# Altium PCB TYPEC_4KRECEIVER-v1.0.PcbDoc (part 7 of 12)
Units mil, origin at the board's own origin, x right, y up, seen from the top; angles counter-clockwise.
Board outline 2834.7 x 1259.84 mil, 10 copper layers (Top Layer, GND-1, Signal L1, GND-2, PWR-1, PWR-2, GND-3, Signal L2, GND-4, Bottom Layer), stack 61.686 mil thick; 492 components, 339 nets, 2214 pads, 1169 vias.
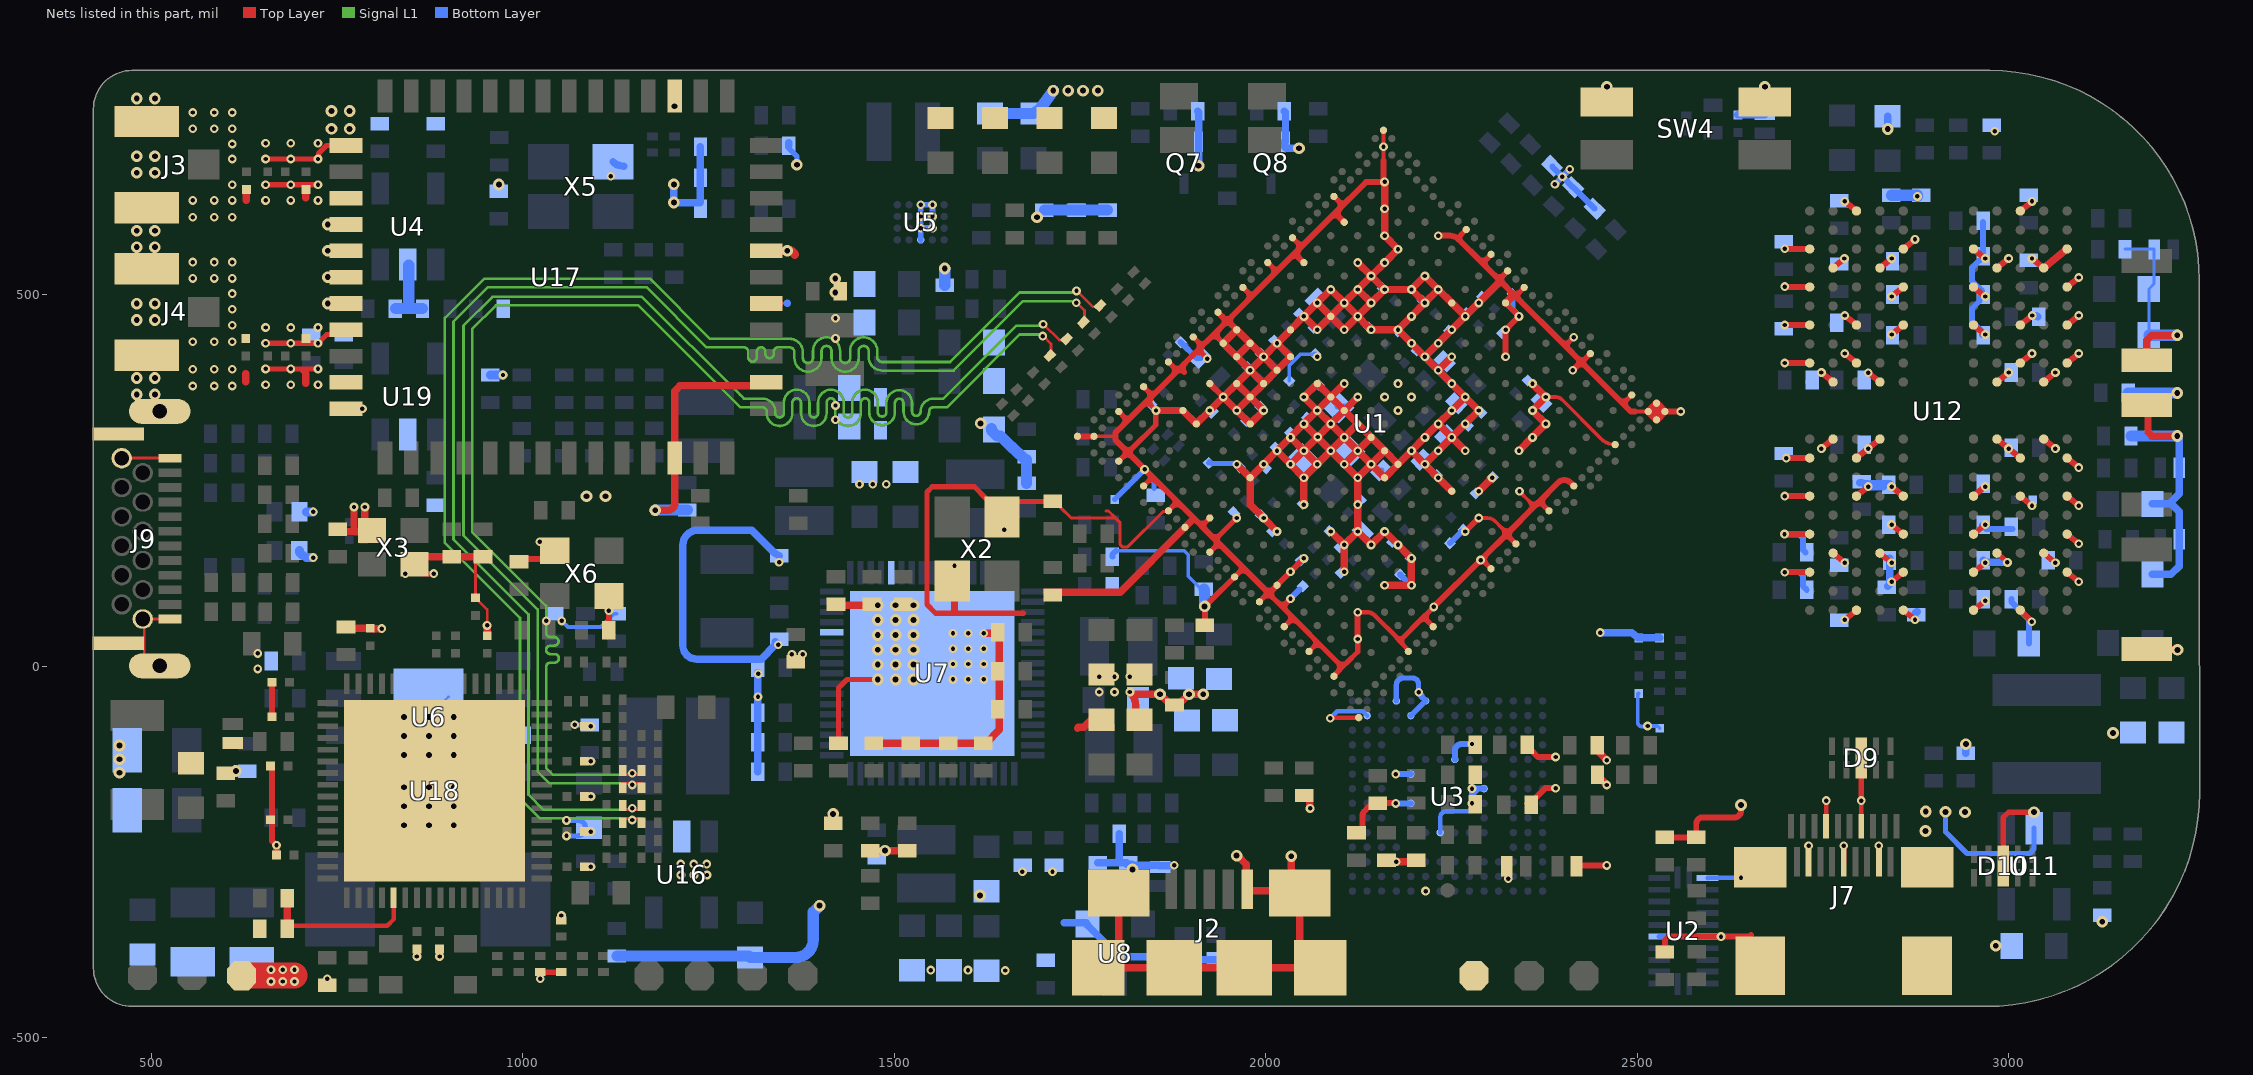
[diagram p12: the nets of this part, all layers, seen from the top]

## Via types
v1: diameter 11.81, hole 5.91, Top Layer to Bottom Layer, tented both sides, 698 vias
v2: diameter 15.75, hole 7.87, Top Layer to Bottom Layer, tented both sides, 248 vias
v3: diameter 11.81, hole 5.91, Top Layer to Signal L1, tented both sides, 121 vias
v4: diameter 11.81, hole 5.91, Top Layer to Bottom Layer, 44 vias
v5: diameter 11.81, hole 5.91, Signal L2 to Bottom Layer, 41 vias
v6: diameter 11.81, hole 5.91, Top Layer to Signal L1, 17 vias

## Nets (pads, with @x,y where several pads share a name; then routed paths per layer and width w, separated by ;. In a path a pad name is that pad's centre, name@x,y a point inside that pad or via, vN(x,y) a via of type N, cw(c..) or ccw(c..) an arc to the next point about the centre after c; other vN are vias at no path point) (continued)
GND: C1.1 C2.1 C3.1 C4.1 C5.1 C8.1 C9.1 C11.2 C12.1 C13.1 C14.1 C15.1 C16.1 C17.1 C18.1 C19.1 C20.1 C21.1 C22.1 C23.1 C24.1 C25.1 C26.1 C27.1 C28.1 C29.1 C30.1 C31.2 C32.1 C33.1 C34.1 C35.1 C36.1 C37.1 C38.2 C40.2 C41.1 C42.2 C43.2 C46.1 C47.1 C48.1 C52.1 C53.1 C54.1 C55.1 C61.2 C62.2 C63.1 C64.1 C65.2 C66.2 C67.1 C68.1 C69.1 C70.1 C71.1 C73.1 C77.2 C78.1 C79.1 C80.1 C81.1 C82.1 C83.1 C84.1 C85.1 C86.1 C87.1 C88.1 C89.1 C90.1 C91.1 C92.1 C93.1 C94.1 C95.1 C96.1 C97.1 C98.1 C99.1 C100.1 C101.1 C102.1 C103.1 C104.1 C105.1 C106.1 C107.1 C108.1 C109.1 C110.1 C111.1 C112.1 C113.1 C114.1 C115.1 C116.1 C117.1 C118.1 C119.2 C120.2 C121.2 C122.2 C123.1 C124.1 C125.1 C126.1 C127.1 C128.1 C129.1 C130.1 C131.1 C132.2 C133.1 C134.1 C135.1 C136.1 C137.1 C138.1 C139.1 C140.1 C141.1 C142.1 C143.1 C144.1 C145.1 C146.1 C147.1 C148.1 C149.2 C150.1 C151.1 C152.1 C153.1 C154.1 C155.1 C156.2 C157.2 C158.2 C159.2 C160.1 C161.1 C162.1 C163.1 C164.1 C165.2 C166.1 C167.1 C168.1 C169.2 C170.1 C171.1 C172.1 C173.1 C174.1 C175.2 C176.1 C178.1 C179.1 C180.1 C181.1 C182.1 C183.1 C184.1 C185.1 C186.1 C188.1 C189.2 C190.1 C191.1 C192.1 C193.1 C194.1 C195.1 C196.1 C197.1 C198.1 C199.1 C200.1 C201.1 C202.1 C203.1 C204.2 C205.2 C206.1 C207.1 C208.1 C209.1 C210.1 C211.1 C212.1 C213.1 C214.1 C215.1 C216.1 C217.1 C218.1 C220.1 C221.1 C223.1 C225.1 C227.1 C228.1 C229.1 C230.1 C231.1 C232.1 C233.1 C234.1 C235.1 C236.1 C237.1 C238.1 C239.1 C240.1 C241.1 C242.1 C243.1 C244.1 C245.1 C246.1 C247.1 C248.1 C249.1 C250.1 C251.2 C252.1 C253.1 C255.1 C256.1 C257.2 C258.1 C262.1 C273.1 C275.1 C287.1 C290.1 C293.1 C300.1 C310.1 C312.1 C313.1 C314.1 C315.1 C316.1 C317.1 C318.1 C319.1 C322.1 C323.1 C324.1 C325.1 C326.1 D1.1 D2.1 D3.1 D4.2 D5.2 D6.2 D7.2 D8.2 D9.3_8 D10.3_8 D11.1 D29.2 D30.2 D31.2 J2.5 J2.S1 J2.S2 J2.S3 J2.S4 J2.S5 J2.S6 J3.2 J3.3 J4.2 J4.3 J7.4 J7.7 J7.10 J7.13 J7.16 J7.20 J9.1 J9.2 J9.3 J9.4 J9.A1 J9.A12 J9.B1 J9.B12 Q7.2 Q8.2 R1.1 R8.1 R11.1 R16.1 R23.1 R24.1 R27.1 R30.1 R33.2 R42.1 R73.2 R86.1 R89.1 R101.1 R108.1 R110.1 R111.2 R113.2 R120.2 R122.2 R123.1 R129.2 R153.2 SW1.1 SW2.1 SW3.2 SW4.2 SW4.4 TP2.1 TP6.1 U1.1B10 U1.1B11 U1.1B15 U1.1B19 U1.1C4 U1.1C5 U1.1C6 U1.1C8 U1.1C9 U1.1C14 U1.1C16 U1.1C18 U1.1D1 U1.1D3 U1.1D4 U1.1D10 U1.1D14 U1.1E3 U1.1E8 U1.1E10 U1.1E14 U1.1E15 U1.1E17 U1.1F6 U1.1F7 U1.1F8 U1.1F9 U1.1F10 U1.1F15 U1.1F16 U1.1F20 U1.1G3 U1.1G6 U1.1G7 U1.1G8 U1.1G9 U1.1G10 U1.1G11 U1.1G12 U1.1G14 U1.1G16 U1.1G18 U1.1G19 U1.1G20 U1.1H1 U1.1H2 U1.1H6 U1.1H11 U1.1H12 U1.1H13 U1.1J1 U1.1J5 U1.1J6 U1.1J8 U1.1J9 U1.1J11 U1.1J12 U1.1J13 U1.1J16 U1.1J18 U1.1K2 U1.1K3 U1.1K4 U1.1K5 U1.1K6 U1.1K8 U1.1K9 U1.1K11 U1.1K12 U1.1K13 U1.1K14 U1.1K15 U1.1K18 U1.1L3 U1.1L6 U1.1L10 U1.1L11 U1.1L12 U1.1L13 U1.1L14 U1.1L15 U1.1L19 U1.1M3 U1.1M4 U1.1M5 U1.1M6 U1.1M10 U1.1M11 U1.1M12 U1.1M13 U1.1M14 U1.1M15 U1.1M16 U1.1M17 U1.1M20 U1.1N3 U1.1N4 U1.1N7 U1.1N11 U1.1N12 U1.1N17 U1.1P1 U1.1P5 U1.1P6 U1.1P7 U1.1P8 U1.1P10 U1.1P14 U1.1P15 U1.1R3 U1.1R4 U1.1R5 U1.1R6 U1.1R7 U1.1R8 U1.1R9 U1.1R11 U1.1R12 U1.1R13 U1.1R14 U1.1R15 U1.1T3 U1.1T5 U1.1T7 U1.1T8 U1.1T9 U1.1T10 U1.1T11 U1.1T12 U1.1T13 U1.1T14 U1.1T15 U1.1T16 U1.1T17 U1.1U2 U1.1U12 U1.1U13 U1.1U15 U1.1U17 U1.1V1 U1.1V4 U1.1V7 U1.1V12 U1.1V13 U1.1V18 U1.A1 U1.A2 U1.A38 U1.AA2 U1.AC37 U1.AD2 U1.AE37 U1.AH37 U1.AL37 U1.AP2 U1.AP8 U1.AP13 U1.AP16 U1.AP19 U1.AP22 U1.AP25 U1.AP28 U1.AP31 U1.AP34 U1.AP37 U1.AR1 U1.AR38 U1.B1 U1.B2 U1.B6 U1.B11 U1.B14 U1.B18 U1.B21 U1.B28 U1.B31 U1.D2 U1.E37 U1.H37 U1.J2 U1.L2 U1.L37 U1.P37 U1.U2 U1.U37 U1.W2 U1.Y37 U2.5 U2.13 U2.18 U3.A6 U3.C4 U3.E7 U3.G5 U3.H10 U3.J5 U3.K8 U3.N2 U3.N5 U3.P4 U3.P6 U4.2 U5.B2 U5.B3 U5.B4 U5.C1 U5.C2 U5.C3 U5.C4 U6.7 U6.9 U7.47 U7.56 U7.62 U7.63 U7.69 U8.1 U11.2 U12.A3 U12.A10 U12.AB3 U12.AB5 U12.AB8 U12.AB10 U12.C1 U12.C5 U12.C8 U12.C12 U12.D2 U12.D4 U12.D9 U12.D11 U12.E1 U12.E5 U12.E8 U12.E12 U12.G1 U12.G3 U12.G5 U12.G8 U12.G10 U12.G12 U12.J1 U12.J3 U12.J10 U12.J12 U12.K2 U12.K4 U12.K9 U12.K11 U12.N2 U12.N4 U12.N9 U12.N11 U12.P1 U12.P3 U12.P10 U12.P12 U12.T1 U12.T3 U12.T5 U12.T8 U12.T10 U12.T12 U12.V1 U12.V5 U12.V8 U12.V12 U12.W2 U12.W4 U12.W9 U12.W11 U12.Y1 U12.Y5 U12.Y8 U12.Y12 U16.2 U17.1 U17.3 U17.4 U17.5 U17.6 U17.7 U17.8 U17.10 U17.11 U17.23 U17.27 U17.30 U17.32 U17.39 U18.65 U19.2 X2.2 X2.4 X3.2 X3.4 X5.2 X6.2 X6.4 | length 20453.2
  Top Layer w3.5: X3.4@854.4,136.88 X3.4@866.94,124.34 ; C66.2@936.55,143.19 C318.1@936.55,91.78 952.3,76.03 v4@952.3,56.6
  Top Layer w4: J9.B1@462.4,279.73 J9.A12@527.36,279.73 ; J9.3@513.58,0.19 490.73,0.19 490.73,63.19 J9.A1@527.36,63.19
  Top Layer w4.1: C129.1@1713.28,221.53 1716.78,221.53 1723.73,214.58 1723.73,213.86 1738.11,199.48 1797.71,199.48 ; 1785.16,208.72 1788.47,208.72 1797.71,199.48 ; U1.AE37@1868.12,207.8 1861.82,207.8 1814.38,160.36 1807.18,160.36 1804.24,163.3 1804.24,192.96 1797.71,199.48
  Top Layer w5: J2.S6@1760.78,-392.14 J2.S6@1774.57,-405.92 ; U1.AP37@1769,309.12 1797.55,309.12 1797.7,309.27 ; 2158.75,680.53 v1(2158.75,698.86) U1.AR1@2158.75,721.14 ; v1(2286.83,199.16) 2298.51,199.16 cw(c2298.51,184.16) 2309.11,194.77 ; v1(2289.35,142.53) 2290.66,141.22 v1@2293.24,141.22 ; 2309.12,194.77 2317.7,186.18 ; 2319.99,173.16 ccw(c2309.55,178.04) 2317.72,186.16 ccw(c2325.67,194.16) 2331.1,184.27 ; v1@2341.75,234.7 2354.74,221.71 ; 2356.46,209.22 ccw(c2346.02,214.1) 2356.76,209.93 ccw(c2346.02,214.1) 2354.19,222.22 ccw(c2362.14,230.22) 2354.74,221.71 ; 2358.35,210.73 ccw(c2350.74,214) 2358.76,211.93 ccw(c2350.74,214) 2356.6,219.85 ; 2367.57,220.34 cw(c2362.14,230.22) 2366.76,219.94 cw(c2362.14,230.22) 2354.74,221.71 ; 2369.16,221.54 cw(c2361.78,228.93) 2368.99,221.37 cw(c2361.78,228.93) 2366.37,219.54 cw(c2361.78,228.93) 2356.6,219.85 ; v1(2377.28,362.02) 2390.97,362.02 cw(c2390.97,351.39) 2398.48,358.9 2451.52,305.87 ; 2451.54,305.85 ccw(c2470.54,324.89) U1.B6@2470.54,297.99 ; 2496.99,342.53 U1.B2@2515.08,342.53 ; 2354.74,221.71 2356.6,219.85
  Top Layer w6: v1(2087.02,-70.26) 2087.4,-69.87 2124.56,-69.87 U1.A38@2124.63,-69.95 ; v1(2123.94,72.49) 2136.3,72.49 cw(c2136.3,57.49) 2146.9,68.1 ; 2146.91,68.1 2177.81,37.19 ccw(c2176.83,75.22) 2184.87,38.04 ccw(c2222.05,30) 2184.01,30 ; 2176.83,37.18 2179.84,34.16 2184.01,30 ; U1.B31@2192.54,20.1 2184.01,30 ; J7.13@2754.73,-215.28 v1(2754.73,-181.19) v1@2754.73,-179.97 ; J7.7@2801.78,-215.48 v1(2801.78,-181.19)
  Top Layer w7: v3(654.01,399.84) v3(687.94,399.84) 701.8,399.84 ; v3(654.01,434.41) v3(687.94,434.41) v3(724.55,434.41) 736.36,446.22 755.88,446.22 U17.8@762.22,452.56 ; v3(654.01,647.87) v3(687.94,647.87) v3(724.55,647.87) ; v3(654.01,682.45) v3(687.94,682.45) v3(724.55,682.45) 725.47,683.37 725.47,689.87 736.2,700.59 U17.1@762.22,700.59 ; 708.21,393.43 708.21,393.58 705.88,395.91 705.73,395.91 701.8,399.84 ; v3(724.55,399.84) 701.8,399.84 ; R120.2@1023.83,-412.12 R122.2@1052.04,-412.12 ; C41.1@1425.18,-103.76 1425.18,-29.48 1436.5,-18.16 v2(1478.09,-18.16) ; X2.4@1627.8,222.22 1625.13,224.89 1624.47,224.89 1608.05,241.31 1551.41,241.31 1544.16,234.05 1544.16,82.64 1555.75,71.05 1561.21,71.05 1674.17,71.05 ; X2.4@1648.88,205.04 1665.37,221.53 C129.1@1713.28,221.53 ; C130.1@1703.71,100.59 C130.1@1703.71,100.86 ; U1.AL37@1802.41,275.71 1810.12,283.43 ; U1.AP34@1802.6,342.36 1810.31,334.64 ; 1808.06,324.09 ccw(c1801.49,330.65) 1808.95,325.13 ccw(c1801.49,330.65) 1809.32,335.63 ccw(c1814.48,340.81) 1818.63,334.8 ccw(c1814.48,340.81) 1819.29,335.32 ; 1808.38,293.7 ccw(c1814.94,300.28) 1809.85,292.51 ccw(c1814.94,300.28) 1819.92,292.44 ccw(c1825.1,287.29) 1819.26,291.66 ; 1809.45,292.41 cw(c1803.96,287.59) 1809.14,282.44 cw(c1814.12,274.6) 1820.15,281.66 ; 1819.62,282.47 cw(c1825.1,287.29) 1819.46,282.65 ; 1820.68,281.17 ccw(c1814.12,274.6) 1820.15,281.66 ; U1.AH37@1835.82,242.31 1843.53,250.02 ; 1835.82,350.96 cw(c1840.64,345.47) 1845.79,350.65 cw(c1853.63,355.63) 1847.06,362.19 ; U1.AP31@1835.82,375.93 1843.53,368.22 ; v1(1837.14,264.59) 1820.85,280.88 cw(c1827.39,287.42) 1820.15,281.66 ; 1841.27,357.66 ccw(c1834.7,364.22) 1842.54,369.2 ccw(c1847.69,374.38) 1852.51,368.9 ; 1842.85,259 cw(c1837.37,254.18) 1842.54,249.03 cw(c1847.53,241.19) 1854.09,247.77 ; 1844.8,351.63 v1(1852.52,343.92) ; U1.1V18@1852.05,343.46 1852.05,324.32 1818.95,291.21 ; U1.AE37@1869.22,208.9 1876.94,216.61 ; U1.AP28@1869.22,409.34 1876.94,401.63 ; 1874.68,391.07 ccw(c1868.11,397.63) 1875.95,402.61 ccw(c1881.1,407.79) 1885.91,402.3 ; 1876.26,225.59 cw(c1870.77,220.78) 1875.95,215.63 cw(c1880.93,207.79) 1887.49,214.36 ; 1880.09,396.47 cw(c1884.91,390.98) 1880.92,397.1 ; 1880.58,395.81 cw(c1885.39,390.32) 1890.54,395.5 ; 1890.29,406.46 cw(c1897.9,401.14) 1891.33,407.7 ; 1890.55,395.5 cw(c1898.38,400.49) 1891.81,407.05 ; U1.AP25@1902.63,442.75 1910.34,435.03 ; 1904.66,420.47 cw(c1909.48,414.98) 1914.63,420.15 cw(c1922.47,425.14) 1915.9,431.7 ; 1907.53,194.68 ccw(c1914.09,201.25) 1908.6,193.76 ccw(c1914.09,201.25) 1919.08,193.41 ccw(c1924.25,188.26) 1918.24,184.12 ccw(c1924.25,188.26) 1918.77,183.44 ; 1908.09,424.48 ccw(c1901.52,431.04) 1909.35,436.02 ccw(c1914.51,441.2) 1919.32,435.71 ; 1913.64,421.14 v1(1921.36,413.43) ; 1918.09,192.42 1924.86,199.19 U1.1M20@1925.8,200.13 ; U1.Y37@1924.9,153.22 1932.61,160.94 ; 1925.81,176.63 ccw(c1932.37,183.2) 1937.29,175.33 ; 1926.3,441.44 cw(c1931.12,435.95) 1936.27,441.12 cw(c1944.11,446.11) 1937.53,452.67 ; 1931.94,169.91 cw(c1926.45,165.1) 1931.63,159.95 cw(c1936.61,152.11) 1943.17,158.68 ; 1935.28,442.11 U1.1V13@1943,434.4 ; U1.AP22@1936.04,476.15 1943.75,468.44 ; 1936.37,174.37 1944.08,182.09 ; 1936.95,174.99 1937.29,175.33 ; 1937.04,165.4 cw(c1942.53,170.21) 1937.35,175.36 cw(c1932.37,183.2) 1937.29,175.33 ; 1941.49,457.88 ccw(c1934.92,464.44) 1942.76,469.42 ; 1942.76,469.43 ccw(c1947.91,474.6) 1952.73,469.12 ; 1944.4,459.53 cw(c1949.21,454.04) 1954.34,459.24 ; 1953.37,460.21 U1.1V12@1961.09,452.49 ; 1954.36,459.22 cw(c1962.2,464.2) 1955.63,470.76 ; U1.U37@1958.31,119.82 1966.02,127.53 ; v1(1961.09,199.16) 1937.29,175.33 ; 1965.35,136.51 cw(c1959.86,131.69) 1966.14,127.97 cw(c1959.86,131.69) 1965.03,126.54 cw(c1970.02,118.7) 1976.58,125.27 ; U1.AP19@1969.44,509.56 1977.16,501.85 ; 1974.9,491.29 ccw(c1968.33,497.85) 1976.17,502.83 ccw(c1981.32,508.01) 1986.13,502.52 ; U1.P37@1991.71,86.41 1999.43,94.12 ; 1998.66,103.59 ccw(c2005.22,110.16) 2010.2,102.32 ccw(c2015.38,97.17) 2009.89,92.36 ; 1998.75,103.1 cw(c1993.26,98.29) 1998.44,93.14 cw(c2003.42,85.3) 2009.99,91.87 ; 1999.52,102.84 ccw(c2008.63,148.4) 2008.63,101.94 ; U1.AP16@2002.85,542.97 2010.56,535.25 ; 2008.06,93.94 2022.73,79.28 ; 2008.31,524.7 ccw(c2001.74,531.26) 2009.57,536.24 ccw(c2014.73,541.42) 2019.54,535.93 ; 2009.22,101.33 2015.97,108.09 U1.1G20@2016.93,109.05 ; 2016.4,85.68 ccw(c2022.96,92.25) 2026.58,83.7 ; U1.L37@2025.12,53 2032.83,60.72 ; 2026.96,83.43 2033.8,90.26 U1.1F20@2034.67,91.14 ; 2027.64,74.45 cw(c2033.13,79.26) 2027.95,84.41 cw(c2022.96,92.25) 2026.58,83.7 ; 2032.16,69.69 cw(c2026.67,64.88) 2031.85,59.73 cw(c2036.83,51.89) 2043.39,58.46 ; v1(2033.47,90.59) 2027.69,84.81 2026.58,83.7 ; 2034.87,550.01 cw(c2039.69,544.52) 2044.82,549.72 ; U1.AP13@2036.26,576.37 2043.97,568.66 ; 2041.71,558.1 ccw(c2035.14,564.66) 2042.98,569.64 ccw(c2048.13,574.82) 2052.95,569.34 ; 2043.85,550.68 U1.1V7@2051.57,542.97 ; 2044.84,549.7 cw(c2052.68,554.68) 2046.11,561.24 ; U1.H37@2058.53,19.6 2066.24,27.31 ; 2065.57,36.29 cw(c2060.08,31.47) 2065.25,26.32 cw(c2070.24,18.48) 2076.8,25.05 ; 2089.16,604.29 cw(c2093.98,598.8) 2099.03,604.07 cw(c2093.98,598.8) 2099.13,603.98 cw(c2106.97,608.96) 2100.4,615.52 ; U1.E37@2091.43,-13.41 2109.35,4.5 cw(c2103.39,11.31) 2097.84,4.17 2022.73,79.28 ; U1.AP8@2091.93,632.05 2099.65,624.34 ; 2096.74,-7.9 ccw(c2090.17,-1.34) 2098,3.64 ccw(c2103.16,8.82) 2107.97,3.33 ; 2097.39,613.78 ccw(c2090.82,620.34) 2098.66,625.32 ; 2098.14,604.97 U1.1V4@2105.85,597.25 ; 2098.66,625.32 ccw(c2103.81,630.5) 2108.63,625.01 ; 2109.45,4.6 2123.94,19.1 v1(2123.94,36.3) ; 2180.99,34.16 2184.87,38.04 2207.87,61.04 ; U1.B28@2225.56,53 2217.85,60.72 ; v1(2226.35,79.53) 2219.11,72.28 ; 2262.39,579.8 2263.37,580.78 ; 2263.06,570.82 cw(c2268.55,575.63) 2262.18,572.08 cw(c2268.55,575.63) 2263.37,580.78 ; U1.AD2@2270.1,587.51 2263.38,580.78 ; 2285.97,548.85 ccw(c2292.53,555.42) 2294.66,546.38 ; v1@2286.22,138.59 cw(c2291.03,133.1) 2296.18,138.28 ; 2286.97,547.28 ccw(c2291.8,555.22) 2294.66,546.38 ; v1@2291.04,143.42 2296.18,138.28 ; 2296.53,546.59 U1.AA2@2303.77,553.84 ; 2297.21,537.62 cw(c2302.7,542.43) 2297.52,547.58 ; 2297.45,149.82 ccw(c2304.02,143.26) 2296.18,138.28 ; U1.AA2@2303.51,554.1 2296.78,547.37 cw(c2291.8,555.22) 2294.66,546.38 ; U1.B21@2303.91,130.55 U1.B21@2303.51,130.95 2296.2,138.27 ; 2307.51,526.37 ccw(c2314.07,532.95) 2309.24,525.02 ccw(c2314.07,532.95) 2316.93,524.11 ; 2308.25,526.58 ccw(c2314.81,533.15) 2316.93,524.11 ; 2311.01,523.1 cw(c2305.52,518.28) 2310.7,513.13 cw(c2315.68,505.29) 2311.88,513.76 cw(c2315.68,505.29) 2322.24,511.86 ; 2318.07,524.12 2318.64,524.69 cw(c2314.81,533.15) 2316.93,524.11 ; 2318.7,524.72 ccw(c2324.23,519.96) 2317.85,516.4 ccw(c2324.23,519.96) 2318.74,515.14 ; 2318.8,524.32 2326.05,531.57 U1.W2@2326.52,532.04 ; 2319.48,515.35 cw(c2324.97,520.16) 2319.79,525.31 ; 2319.62,172 cw(c2324.44,166.51) 2329.59,171.69 ; U1.1J1@2322.78,488.9 2328.5,494.61 ; U1.1J1@2323,488.68 2329.46,495.15 ; 2324.45,176.82 2329.59,171.69 ; U1.W2@2325.78,531.83 2319.05,525.1 cw(c2314.07,532.95) 2316.93,524.11 ; 2328.28,505.7 cw(c2322.79,500.89) 2327.97,495.74 cw(c2332.95,487.9) 2339.51,494.47 ; 2328.51,494.62 cw(c2333.49,486.79) 2329.46,495.15 ; 2330.86,183.23 ccw(c2337.43,176.67) 2329.59,171.69 ; 2331.51,502.74 ccw(c2336.34,510.67) 2341.32,502.83 ; 2334.28,499.97 2329.46,495.15 ; U1.B18@2337.31,163.96 U1.B18@2336.92,164.36 2329.6,171.67 ; 2340.05,493.36 ccw(c2333.49,486.79) 2329.46,495.15 ; 2340.34,501.85 2341.32,502.83 ; 2341.01,492.87 cw(c2346.5,497.69) 2340.12,494.13 cw(c2346.5,497.69) 2341.32,502.83 ; U1.U2@2348.05,509.56 2341.32,502.83 ; 2364.17,216.54 cw(c2368.98,211.05) 2374.13,216.23 ; 2368.99,221.37 2374.13,216.23 ; 2375.4,227.77 ccw(c2381.97,221.21) 2374.13,216.23 ; U1.B14@2381.86,208.5 U1.B14@2381.46,208.9 2374.14,216.22 ; 2396.61,437.38 ccw(c2403.17,443.96) 2397.97,436.27 ccw(c2403.17,443.96) 2408.15,436.11 ; 2407.17,435.13 2408.15,436.11 ; 2407.85,426.15 cw(c2413.33,430.97) 2407.15,427.08 cw(c2413.33,430.97) 2408.15,436.11 ; U1.1D1@2412.69,397.43 v1(2413.47,398.21) 2420.4,405.14 ; U1.L2@2414.88,442.84 2414.63,442.58 2408.16,436.11 ; 2418.86,415.02 ccw(c2425.43,421.59) 2420.54,413.69 ccw(c2425.43,421.59) 2430.4,413.75 ; 2419.42,404.15 cw(c2424.4,396.32) 2430.96,402.89 ; 2419.41,404.16 ccw(c2414.24,409.3) 2419.72,414.12 ; 2429.42,412.76 2430.4,413.74 ; 2430.1,403.78 cw(c2435.59,408.6) 2429.24,405 cw(c2435.59,408.6) 2430.4,413.74 ; U1.J2@2437.14,420.48 2430.41,413.75 ; 2474.54,359.34 ccw(c2481.1,365.91) 2476.22,358.01 ccw(c2481.1,365.91) 2486.08,358.07 ; 2485.1,357.09 2486.08,358.07 ; 2485.78,348.11 cw(c2491.26,352.92) 2484.91,349.32 cw(c2491.26,352.92) 2486.08,358.07 ; U1.D2@2492.81,364.8 2486.09,358.07 ; J7.16@2730.91,-263.51 v1(2730.91,-241.83) ; J7.10@2778.15,-263.51 v3(2778.15,-241.83) ; v1(2801.78,-181.19) D9.3_8@2801.78,-123.75 ; J7.4@2825.4,-263.51 v3(2825.4,-241.83) ; U12.W9@2984.32,151.9 v1@2998.65,139.76 ; D10.3_8@2992.74,-268.96 2992.74,-203.83 2999.84,-196.73 v2(3034.35,-196.73) ; v1(2998.41,139.48) v1@2998.65,139.72 ; 1818.95,291.21 cw(c1825.1,287.29) 1819.26,291.66 ; 1818.95,291.21 cw(c1827.39,287.42) 1819.07,291.47 1819.26,291.66 ; 1818.95,291.21 ccw(c1827.39,287.42) 1819.15,283.21 ccw(c1827.39,287.42) 1819.46,282.65 ; 1818.95,291.21 ccw(c1825.1,287.29) 1818.86,283.5 ccw(c1825.1,287.29) 1819.46,282.65 ; 1819.46,282.65 ccw(c1827.39,287.42) 1820.15,281.66 ; 2022.73,79.28 2022.73,79.85 2026.58,83.7 ; 2207.87,61.04 cw(c2212.69,55.55) 2217.83,60.73 ; 2207.87,61.04 2212.7,65.87 ; 2212.7,65.87 2219.1,72.27 ; 2212.7,65.87 2217.83,60.73 ; 2217.84,60.73 cw(c2225.67,65.71) 2219.1,72.27
  Top Layer w7.5: X3.4@866.94,124.34 v3(880.25,124.34)
  Top Layer w8: C317.1@662.7,-134.72 662.7,-235.28 v4@668.1,-240.67 ; C146.1@662.7,-68.28 C55.1@662.7,-22.01 ; C323.1@995.17,140.47 998.52,143.83 1031.79,143.83 X6.2@1043.27,155.31 ; C322.1@1116.1,53.75 v3(1116.1,74.56) X6.4@1116.1,94.28 ; U1.AR38@1746.73,309.12 U1.AP37@1769,309.12 ; U1.AC37@1890.96,186.33 1895.57,190.94 ; C141.1@1918.18,55.03 v2@1918.18,78.36 ; v2@1918.18,80.01 1966.14,127.97 1967.76,129.59 ; U1.1U15@1924.9,380.11 v1(1942.99,362.02) ; U1.AP22@1936.04,476.15 1941.89,470.29 1948.01,464.18 ; U1.1V12@1961.09,452.49 1954.34,459.24 1948.7,464.88 ; 1999.52,102.84 1918.24,184.12 1908.6,193.76 1819.15,283.21 1818.86,283.5 1809.85,292.51 1797.7,304.66 1797.7,309.27 1797.7,313.87 1808.95,325.13 1818.63,334.8 1880.92,397.1 1885.03,401.2 1890.29,406.46 1948.01,464.18 ; 2008.63,101.94 v1(2033.47,126.78) v1(2051.56,144.87) ; 2018.25,534.45 2018.3,534.47 ; U1.1V7@2051.57,542.97 2044.82,549.72 2039.67,554.86 2038.69,554.86 ; U1.1V4@2105.85,597.25 2100.57,602.54 2099.04,604.07 2095.11,608 2091.82,608 ; C252.1@2122.35,-224.45 2130.62,-219.45 2130.62,-201.23 cw(c2138.62,-201.23) 2132.63,-195.92 2138.21,-189.63 2146.71,-184.63 R108.1@2150.71,-184.63 v1@2171.86,-184.63 ; v1(2123.94,36.3) v1(2123.94,72.49) ; v1@2155.22,651.54 2135.37,651.54 ; 2158.86,680.42 2158.86,652.45 2158.79,652.45 cw(c2157.45,652.49) U1.1V1@2158.4,651.54 ; v1(2160.14,651.54) U1.1V1@2158.4,651.54 ; v1(2226.35,79.53) v1(2289.35,142.53) 2331.1,184.27 2356.76,209.93 2358.76,211.93 2366.37,219.54 2366.76,219.94 2393.49,246.67 cw(c2402,238.16) 2402,250.19 cw(c2402,238.16) 2410.51,246.67 U1.B11@2414.86,242.31 ; v1(2232.52,579.16) 2248.23,579.16 cw(c2248.23,562.58) 2259.93,574.32 2262.18,572.08 2286.97,547.28 2309.24,525.02 2316.19,518.07 2317.85,516.4 2331.51,502.74 2333.14,501.11 ; v1(2268.71,181.06) v1(2286.83,199.16) ; v1(2322.99,416.3) U1.1H2@2322.99,452.02 ; U1.1J1@2323,488.68 v1(2341.09,470.59) 2327.39,456.89 ccw(c2337.99,446.28) U1.1H2@2324.13,452.02 ; 2336.37,497.88 2340.12,494.13 2343.68,490.58 ; 2340.97,493.26 2397.97,436.27 2407.15,427.08 2420.54,413.69 2424.75,409.49 ; C191.1@2352.35,-104.83 2357.35,-109.83 2357.35,-113.43 2366.39,-122.47 v1@2388.59,-122.47 ; C193.1@2356.89,-184.01 2376.43,-164.47 v1@2387.43,-164.47 ; v1(2413.47,398.21) 2424.75,409.49 ; v1(2414.81,442.4) v1(2414.81,442.4) ; D5.2@2419.39,-268.36 v3(2459.27,-268.36) ; 2496.99,342.53 2491.71,342.53 2484.91,349.32 2476.22,358.01 2429.24,405 2424.75,409.49 ; 2526.22,342.53 U1.A1@2537.36,342.53 v1(2558.81,342.53) ; C176.1@2537.4,-385.01 2537.4,-368.83 2542.09,-364.15 2651.17,-364.15 2653.3,-362.02 ; C175.2@2537.4,-230.64 C189.2@2579.65,-230.64 2579.65,-212.49 cw(c2588.37,-212.49) 2588.37,-203.78 2631.08,-203.78 ccw(c2631.08,-194.97) 2639.89,-194.97 v2(2639.89,-187.01) ; v1(2698.48,177.49) U12.V1@2732.35,177.49 ; v1(2698.81,126.31) U12.Y1@2732.35,126.31 ; v1(2698.81,228.67) U12.T1@2732.35,228.67 ; v1@2698.81,279.85 v1(2700.81,279.85) U12.P1@2732.35,279.85 ; v1(2698.81,407.8) U12.J1@2732.35,407.81 ; v1(2698.81,458.98) U12.G1@2732.35,458.99 ; v1(2698.81,510.64) 2699.05,510.4 2732.12,510.4 U12.E1@2732.35,510.17 ; v1(2698.81,561.47) v1(2698.81,561.47) 2732.3,561.41 U12.C1@2732.35,561.35 ; v1(2748.1,292.65) U12.N2@2763.85,305.44 ; v1(2748.1,395.01) U12.K2@2763.85,382.22 ; U12.D2@2763.35,535.56 2763.75,535.88 v1@2779.1,548.35 ; U12.W2@2763.85,151.9 v1(2779.6,139.1) ; v1(2779.6,62.33) U12.AB3@2795.34,75.13 ; v1(2779.6,420.65) U12.J3@2795.34,407.81 ; v1(2779.6,471.78) U12.G3@2795.34,458.99 ; v1(2779.6,625.32) U12.A3@2795.34,612.53 ; U12.T3@2795.34,228.67 v1(2811.1,241.46) ; U12.P3@2795.34,279.85 v1(2811.1,292.65) 2816.91,297.37 2818.36,298.54 U12.N4@2826.84,305.44 ; v1(2811.1,394.77) U12.K4@2826.84,382.22 ; U12.W4@2826.84,151.9 v1(2842.59,139.1) ; U12.D4@2826.84,535.76 v1(2842.59,548.52) ; v1(2842.59,113.51) U12.Y5@2858.34,126.31 ; v1(2842.59,190.28) U12.V5@2858.34,177.49 ; v1(2842.59,241.46) U12.T5@2858.34,228.67 ; v1(2842.59,446.19) U12.G5@2858.34,458.99 ; v1(2842.59,497.37) U12.E5@2858.34,510.17 ; U12.AB5@2858.34,75.13 v1(2874.09,62.33) ; U12.C5@2858.34,561.35 v1(2874.09,574.14) ; U12.AB8@2952.82,75.13 v1(2968.58,87.92) ; U12.Y8@2952.82,126.31 v1(2968.58,139.1) ; U12.V8@2952.82,177.49 v1(2968.58,190.28) ; U12.T8@2952.82,228.67 v1(2968.58,241.46) ; U12.G8@2952.82,458.99 v1(2968.58,446.19) ; U12.E8@2952.82,510.17 v1(2968.58,497.37) ; U12.C8@2952.82,561.35 v1(2968.58,548.55) ; U12.N9@2984.32,305.44 v1(3000.07,292.64) U12.P10@3015.82,279.85 ; U12.D9@2984.32,535.76 v1(3000.07,548.55) ; U12.AB10@3015.64,74.91 v1@3031.06,59.49 ; U12.T10@3015.82,228.67 v1(3031.57,215.87) ; U12.J10@3015.82,407.81 v1(3031.57,420.6) ; U12.G10@3015.82,458.99 v1@3031.57,471.78 ; U12.A10@3015.82,612.53 v1(3031.57,625.32) ; v1(3031.57,548.55) U12.D11@3047.31,535.76 ; U12.W11@3047.31,151.9 v1(3063.06,139.1) ; U12.N11@3047.31,305.44 v1(3063.06,292.64) ; U12.Y12@3078.81,126.31 v1(3094.56,113.51) ; U12.V12@3078.81,177.49 v1(3094.56,164.69) ; U12.T12@3078.81,228.67 v1(3094.56,215.87) ; U12.P12@3078.81,279.85 v1(3094.56,267.05) ; U12.J12@3078.81,407.81 v1(3094.56,420.6) ; U12.E12@3078.81,510.17 v1(3094.56,522.96) ; 1948.01,464.18 1948.7,464.88 ; 1948.7,464.88 2018.3,534.47 ; 2018.3,534.47 2038.69,554.86 ; 2038.69,554.86 2091.82,608 ; 2091.82,608 2135.37,651.54 ; 2135.37,651.54 U1.1V1@2158.4,651.54 ; U12.K9@2984.32,382.22 v1(3000.07,395.01) U12.K9@2984.32,382.22 ; U12.K11@3047.31,382.22 v1(3063.06,395.01) U12.K11@3047.31,382.22 ; U12.G12@3078.81,458.99 v1(3094.56,471.78) U12.G12@3078.81,458.99
  Top Layer w10: 627.22,382.41 627.29,382.41 627.29,393.48 ; 628.29,626.77 C184.1@628.29,641.54 ; C325.1@668.7,-254.39 v4@668.7,-241.24 ; 708.21,380.44 708.21,393.43 ; 708.21,630.47 708.29,630.47 C182.1@708.29,641.54 ; C275.1@751.07,180.89 773.55,180.89 ; R129.2@762.26,52.45 763.95,50.76 C316.1@794.83,50.76 ; v1(773.07,213.99) 773.07,181.37 773.55,180.89 ; v1(787.69,213.99) 787.69,191.77 X3.2@797.31,182.15 796.04,180.89 773.55,180.89 ; C316.1@795.19,50.4 v3(810.49,50.4) ; X3.4@854.4,136.88 864.41,146.89 C273.1@904.74,146.89 C66.2@946.71,146.89 ; C315.1@952.3,40.76 v4@952.3,54.52 ; v2(1178.44,209.74) 1195.76,209.74 ccw(c1195.76,218.77) 1204.79,218.77 U17.23@1204.79,279.48 ; U17.23@1204.54,279.73 1204.54,369.77 1211.71,376.93 1323.21,376.93 U17.27@1327.97,381.7 ; C37.1@1421.78,86.1 ccw(c1432.06,96.38) 1432.06,81.84 v2(1478.09,81.84) ; C38.2@1467.68,-248.51 v2(1487.68,-248.51) C19.1@1517.68,-248.51 ; C20.1@1472.68,-103.76 C18.1@1522.68,-103.76 C14.1@1572.68,-103.76 C15.1@1620.26,-103.76 1623.76,-103.76 1641.68,-85.83 1641.68,45.67 cw(c1637.66,49.69) 1637.66,44 v3(1620.63,44) ; 1581.32,73.44 X2.2@1581.32,114.22 ; X2.4@1629.63,223.39 1635.72,217.3 1636.06,217.3 1648.25,205.11 X2.4@1648.25,200.83 ; X2.4@1639.29,220.53 X2.4@1648.25,220.53 ; C130.1@1710.12,99.36 1804.23,99.36 U1.AC37@1891.49,186.63 1902.69,197.83 ; 1746.83,-83.58 1747.94,-82.47 1755.18,-82.47 C98.1@1765.18,-72.47 ; J2.S1@1802.13,-305.53 1802.13,-378.36 J2.S6@1774.57,-405.92 J2.S5@1876.93,-405.92 J2.S4@1971.42,-405.92 J2.S3@2073.78,-405.92 2046.22,-378.36 J2.S2@2046.22,-305.53 J2.S2@2043.44,-302.75 ; C100.1@1825.18,-72.47 1825.18,-53.19 ccw(c1800.88,-53.19) 1818.09,-36.03 ccw(c1822.7,-31.37) 1822.7,-37.92 v2(1857.78,-37.92) 1868.73,-48.87 ccw(c1877.36,-40.24) R16.1@1877.36,-52.45 ccw(c1877.36,-40.24) 1885.99,-48.88 v2(1896.94,-37.92) v2(1916.11,-37.92) ; v1(1852.52,343.92) U1.1U17@1888.71,343.92 U1.1T17@1906.81,325.82 v1(1924.9,343.92) v1(1942.99,362.02) ; v2(1961.01,-255.26) 1962.33,-255.26 1973.69,-266.61 1973.69,-298.94 J2.5@1975.36,-300.61 ; v1(1961.09,271.54) U1.1M17@1979.18,253.44 ; J2.5@1975.36,-302.75 J2.S2@2043.44,-302.75 ; v1(2015.37,181.06) v1(1997.28,199.16) 1979.18,217.25 U1.1M17@1979.18,253.44 ; U1.1T11@2015.62,434.61 U1.1T10@2033.72,452.7 ; U1.1T10@2033.49,452.48 U1.1T9@2051.58,470.58 ; v2(2034.44,-256.1) 2034.44,-293.75 J2.S2@2043.44,-302.75 ; J2.S2@2048.11,-302.75 J2.S2@2043.44,-302.75 ; v1(2051.56,217.25) v1(2051.56,253.44) ; C251.2@2052.31,-174.34 2055.51,-174.34 2059.51,-178.34 2059.51,-191.36 v1(2059.86,-191.7) ; v1(2069.66,271.54) v1(2051.56,253.44) ; U1.1N11@2069.66,380.11 v1(2051.56,362.02) v1(2069.66,343.92) ; v1(2069.66,488.68) v1(2087.75,506.78) v1(2105.85,488.68) ; U1.1L13@2069.66,307.73 v1(2070.13,308.2) v1(2087.75,325.83) v1(2105.85,307.73) ; v1(2069.66,343.92) v1(2087.75,325.83) U1.1L11@2105.85,343.92 ; U1.1N11@2069.66,380.11 U1.1M11@2087.76,362.01 ; v1(2087.75,181.06) v1(2105.85,162.97) ; v1(2105.85,126.78) v1(2105.85,162.97) ; v1(2105.85,380.11) U1.1M11@2087.76,362.01 ; v1(2123.94,362.02) U1.1L11@2105.85,343.92 ; v1(2123.94,542.97) v1(2142.04,524.87) ; v1(2160.14,108.68) v1(2196.33,108.68) 2196.33,138.66 ccw(c2181.33,138.66) 2195.18,144.4 ccw(c2181.33,138.66) 2191.93,149.27 v1(2178.23,162.97) v1(2160.14,181.06) v1(2142.04,162.97) v1(2123.94,181.06) ; U1.1U2@2160.14,614.65 v1(2160.14,615.35) ; v1(2160.14,651.54) v1(2160.14,615.35) ; v1(2175.96,-263.56) 2197.51,-263.56 ccw(c2197.51,-256.36) C192.1@2202.6,-261.45 ; v1(2250.61,307.73) v1(2232.52,289.64) v1(2214.42,271.54) ; U1.1D10@2250.62,235.35 v1(2232.52,253.44) v1(2214.42,271.54) ; v1(2250.61,416.3) v1(2232.52,398.21) ; v1(2268.71,289.64) v1(2250.61,307.73) ; v1(2286.8,235.35) v1(2304.9,253.44) ; v1(2286.8,488.68) v1(2268.71,470.59) ; U1.1K2@2286.94,488.68 2316.07,517.81 2316.44,518.19 ; U1.1J1@2323,488.68 2329.46,495.15 2334.28,499.97 ; v1(2341.09,289.64) v1(2359.18,307.73) ; v1(2359.18,307.73) v1(2377.28,325.83) v1(2359.18,343.92) v1(2377.28,362.02) v1(2359.18,380.11) ; C134.1@2444.14,-144.55 2446.35,-146.82 2450.3,-150.88 2455.05,-155.77 v3@2459.27,-159.99 ; C253.1@2444.14,-111.29 2450.3,-117.62 2455.05,-122.51 v3@2459.27,-126.73 ; C134.1@2446.7,-146.47 2446.7,-142.97 C134.1@2450.7,-138.97 ; 2526.22,342.53 U1.B2@2515.08,342.53 ; U12.D11@3047.31,535.76 U12.C12@3078.81,561.35 ; SW2.1@3186.17,22.79 3187.23,21.73 v2(3227.36,21.73) ; SW1.1@3186.17,351.46 3187.66,349.97 3187.66,314.81 3192.94,309.53 v2(3227.13,309.53) ; SW3.2@3186.17,411.53 3186.17,438.27 3193.09,445.18 v2(3227.13,445.18) ; v1(1942.99,362.02) U1.1T14@1961.09,380.11 ; v1(1942.99,362.02) v1(1961.09,343.92) ; v1(1961.09,343.92) U1.1R14@1979.18,362.02 ; v1(1961.09,343.92) 1979.18,325.83 v1(1997.28,343.92) U1.1R14@1979.18,362.02 ; U1.1T14@1961.09,380.11 v1(1979.18,398.21) ; U1.1T14@1961.09,380.11 U1.1R14@1979.18,362.02 ; U1.1U13@1961.09,416.3 U1.1U12@1979.18,434.4 ; U1.1U13@1961.09,416.3 v1(1979.18,398.21) ; U1.1U13@1961.09,416.3 U1.1V13@1943,434.4 U1.1V12@1961.09,452.49 U1.1U12@1979.18,434.4 ; U1.1M17@1979.18,253.44 v1(1997.28,271.54) v1(2015.37,289.64) ; U1.1R14@1979.18,362.02 U1.1R13@1997.28,380.11 ; v1(1979.18,398.21) v1(1997.28,416.3) ; U1.1T13@1979.19,398.2 U1.1R13@1997.28,380.11 ; U1.1U12@1979.18,434.4 v1(1997.28,416.3) ; U1.1R13@1997.28,380.11 U1.1R12@2015.38,398.2 ; v1(1997.28,416.3) v1(2015.37,434.4) U1.1R11@2033.47,416.3 U1.1R12@2015.38,398.2 ; v1(1997.28,416.3) U1.1R12@2015.38,398.2 ; v1(2015.37,289.64) v1(2033.47,307.73) ; v1(2015.37,289.64) v1(2033.47,271.54) ; v1(2033.47,271.54) v1(2051.56,289.64) ; v1(2033.47,271.54) v1(2051.56,253.44) ; v1(2033.47,307.73) v1(2051.56,325.83) ; v1(2033.47,307.73) v1(2051.56,289.64) ; v1(2051.56,289.64) U1.1L13@2069.66,307.73 ; v1(2051.56,289.64) v1(2069.66,271.54) v1(2087.75,289.64) ; v1(2051.56,325.83) U1.1L13@2069.66,307.73 ; v1(2051.56,325.83) v1(2069.66,343.92) ; v1(2051.56,470.59) v1(2069.66,452.49) U1.1R8@2087.76,470.59 ; v1(2051.56,470.59) 2069.67,488.68 U1.1R8@2087.76,470.59 ; U1.1L13@2069.66,307.73 v1(2087.75,289.64) ; v1(2069.66,343.92) U1.1M11@2087.76,362.01 ; v1(2087.75,289.64) v1(2105.85,307.73) ; v1(2087.75,289.64) v1(2105.85,271.54) ; U1.1M11@2087.76,362.01 U1.1L11@2105.85,343.92 ; U1.1R8@2087.76,470.59 v1(2105.85,452.49) v1(2123.94,470.59) ; U1.1R8@2087.76,470.59 v1(2105.85,488.68) ; v1(2105.85,162.97) v1(2123.94,181.06) ; v1(2105.85,271.54) v1(2123.94,289.64) ; v1(2105.85,271.54) v1(2123.94,253.44) ; v1(2105.85,307.73) U1.1K11@2123.95,325.82 ; v1(2105.85,307.73) v1(2123.94,289.64) ; U1.1L11@2105.85,343.92 U1.1K11@2123.95,325.82 ; v1(2105.85,488.68) v1(2123.94,506.78) ; U1.1R7@2105.85,488.68 v1(2123.94,470.59) ; v1(2123.94,181.06) v1(2123.94,217.25) v1(2123.94,253.44) ; v1(2123.94,253.44) v1(2142.04,271.54) ; v1(2123.94,289.64) U1.1J11@2142.04,307.73 ; v1(2123.94,289.64) v1(2142.04,271.54) ; U1.1K11@2123.95,325.82 U1.1J11@2142.04,307.73 ; v1(2123.94,470.59) 2127.26,473.9 2131.95,478.59 v1(2142.04,488.68) ; v1(2123.94,470.59) 2137.65,456.89 ccw(c2148.25,467.49) 2142.51,453.63 ccw(c2148.25,467.49) 2148.25,452.49 v1(2178.23,452.49) ; v1(2123.94,506.78) v1(2142.04,524.87) ; v1(2123.94,506.78) v1(2142.04,488.68) ; v1(2142.04,271.54) U1.1H11@2160.14,289.63 ; v1(2142.04,271.54) U1.1G12@2160.14,253.44 U1.1G11@2178.23,271.54 ; U1.1J11@2142.04,307.73 U1.1H11@2160.14,289.63 ; v1(2142.04,488.68) U1.1P5@2160.14,506.78 ; v1(2142.04,524.87) v1(2160.14,542.97) v1(2178.23,561.06) v1(2160.14,579.16) v1(2160.14,615.35) ; v1(2142.04,524.87) v1(2160.14,506.78) ; U1.1H11@2160.14,289.63 U1.1G11@2178.23,271.54 ; v1(2160.14,506.78) v1(2196.33,506.78) ; U1.1G11@2178.23,271.54 v1(2196.33,289.64) ; v1(2178.23,452.49) v1(2196.33,470.59) v1(2214.42,488.68) ; v1(2178.23,452.49) v1(2196.33,434.4) v1(2214.42,416.3) ; v1(2196.33,289.64) v1(2214.42,307.73) v1(2232.52,325.83) ; v1(2196.33,289.64) v1(2214.42,271.54) ; v1(2196.33,506.78) v1(2214.42,524.87) v1(2232.52,506.78) ; v1(2196.33,506.78) v1(2214.42,488.68) ; v1(2214.42,416.3) v1(2232.52,434.4) v1(2250.61,452.49) v1(2268.71,470.59) ; v1(2214.42,416.3) v1(2232.52,398.21) ; v1(2214.42,488.68) v1(2232.52,506.78) ; v1(2232.52,325.83) v1(2250.61,343.92) v1(2268.71,362.02) ; v1(2232.52,325.83) v1(2250.61,307.73) ; v1(2232.52,398.21) v1(2250.61,380.11) v1(2268.71,362.02) ; v1(2232.52,506.78) U1.1L3@2250.62,488.68 v1(2268.71,470.59) ; v1(2250.61,307.73) v1(2268.71,325.83) v1(2286.8,343.92) v1(2268.71,362.02) ; U1.B2@2515.08,342.53 U1.B1@2526.22,353.66 U1.A1@2537.36,342.53 U1.A2@2526.22,331.39 U1.B2@2515.08,342.53
  Top Layer w12: U17.30@1327.97,488 U17.30@1345.12,487.95 ; U17.32@1327.97,558.86 v2(1356.27,558.86) 1361.42,558.86 1366.26,554.02
  Top Layer w35: TP2.1@621.77,-416.63 692.89,-416.63
  Bottom Layer w3.5: U6.9@873.35,-68.28 U6.9@900.25,-41.38
  Bottom Layer w4: C179.1@3156.81,561.13 3195.54,561.13 D3.1@3196.08,560.58 3195.53,560.04 3195.53,514.22 C231.1@3188.87,507.57 C201.1@3188.87,445.19
  Bottom Layer w5: v5(1052.79,60.7) 1061.03,52.45 1105.28,52.45 1123.15,70.31 C11.2@1126.65,70.31 ; C21.1@1798.68,155.03 1890.43,155.03 1895.86,149.59 1895.86,120.81 C122.2@1913.43,103.24 ; C160.1@2031.8,384.28 2031.8,404.49 2046.81,419.5 2064.65,419.5 C163.1@2065.7,420.56 ; C159.2@2502.35,-37 ccw(c2502.35,-38.49) 2500.86,-38.49 2500.86,-64.14 2500.86,-75.75 ccw(c2506.61,-75.75) 2506.61,-81.51 2513.46,-81.51 v1(2514.17,-80.8) ; v1@2514.34,-80.63 2527.1,-80.63 C140.1@2530.4,-83.92
  Bottom Layer w6: v1(2033.47,126.78) v1(2051.56,144.87) ; v1(2087.02,-70.26) 2096.38,-60.89 2130.77,-60.89 U3.N2@2136.59,-66.71 ; U3.E7@2235.01,-224.19 2235.01,-203.94 cw(c2243.47,-203.94) 2243.47,-195.47 2271.37,-195.47 ccw(c2271.37,-188.99) 2277.85,-188.99 v1(2277.85,-184.97) ; U2.13@2594.84,-285.41 2595.07,-285.17 2639.65,-285.17 v1(2639.89,-284.94)
  Bottom Layer w7: v5(1059.01,-228.69) 1073.7,-228.69 ccw(c1073.7,-217.79) 1084.6,-217.79 ccw(c1074.65,-217.79) 1074.65,-207.84 v5(1059.01,-207.84) ; v5@1070.21,-79.46 C293.1@1084.6,-79.46 ; C3.1@1356.42,698.55 1369.12,685.85 v2(1369.12,674.57) v2@1369.12,672.73 ; C128.1@1796.99,224.44 1797.36,224.44 1799.4,226.49 1799.4,226.85 v1(1837.14,264.59) 1849.83,251.89 1849.83,238.95 ; C125.1@1923.21,273.27 1926.61,273.27 1927.2,272.69 1958.64,272.69 1959.79,271.54 v1(1961.09,271.54) ; C125.1@1924.61,275.27 C125.1@1925.28,274.61 ; U3.P4@2175.96,-47.02 2175.96,-25.66 cw(c2185.65,-25.66) 2185.65,-15.96 2197.08,-15.96 cw(c2197.08,-24.84) 2205.95,-24.84 2205.95,-35.24 v1(2206.14,-35.43) ; U2.5@2529.88,-364.15 U2.18@2594.84,-364.15 ; U2.18@2594.84,-364.15 v1(2612.94,-364.17) ; v2(2915,-196.27) 2915,-223.1 2944.18,-252.28 3028.17,-252.28 3034.35,-246.1 U11.2@3034.35,-218.39
  Bottom Layer w8: U5.C1@1535.86,573.56 v1(1535.86,589.31) ; C21.1@1793.68,147.03 1793.68,150.03 C21.1@1798.68,155.03 ; C124.1@1885.71,435.88 1906.98,414.61 C119.2@1912.27,414.61 ; C122.2@1913.43,103.24 C122.2@1916.93,103.24 ; v1(1961.09,343.92) 1961.09,343.29 1973.79,330.59 C118.1@1973.79,329.96 ; v1(2033.47,90.59) 2034.63,91.75 2034.63,91.92 C156.2@2045.94,103.23 ; C149.2@2071.75,378.05 2087.77,362.03 v1(2105.85,380.11) ; C105.1@2096.55,349.17 2111.1,349.17 v1(2123.94,362.02) ; v1(2142.04,271.54) 2149.52,264.06 C84.1@2155.73,263.21 ; v1(2175.19,-184.97) U3.G5@2195.49,-184.97 ; v1(2175.19,-145.45) U3.J5@2195.64,-145.45 ; C155.1@2181,123.05 2181.48,123.05 2195.85,108.68 v1(2196.33,108.68) ; U3.N5@2195.64,-66.71 U3.P6@2215.33,-47.02 2215.33,-46.48 2209.65,-40.81 2209.65,-39.97 2206.14,-36.46 v1(2206.14,-35.43) ; v1(2196.33,434.4) 2204.4,425.32 C88.1@2204.79,424.88 ; C83.1@2248.16,165.27 2263.95,181.06 v1(2268.71,181.06) ; U3.K8@2254.7,-125.76 2254.7,-114.05 cw(c2263.77,-114.05) 2263.77,-104.98 v1(2277.85,-104.98) ; v1(2277.85,-184.97) 2278.07,-173.29 ; v1(2277.85,-164.97) ccw(c2278.23,-164.6) v1@2278.23,-165.13 ; U3.H10@2294.07,-165.13 2285.61,-165.13 ; C143.1@2332.29,500.86 2332.29,480.42 2341.09,471.62 v1(2341.09,470.59) ; C139.1@2385.91,672.08 v1(2399.46,658.53) ; v1(2389.46,648.53) v1(2399.46,658.53) ; v1(2409.46,668.53) v1(2399.46,658.53) ; C117.1@2442.94,615.61 C138.1@2413.93,644.61 2413.65,644.61 2399.73,658.53 v1(2399.46,658.53) ; v1(2698.48,177.49) 2699.21,176.76 2718.68,176.76 2723.37,172.07 2723.37,156.36 C235.1@2726.9,152.83 ; v1(2698.81,126.31) 2718.67,126.31 2723.36,121.62 2723.36,107.53 C202.1@2728.36,102.53 ; C245.1@2960.3,508.53 2950.79,518.05 2950.79,535.92 C250.1@2960.86,545.99 ; C245.1@2960.86,508.53 2964.4,504.99 C245.1@2964.4,500.03 ; C210.1@2964.4,190.03 2969.94,184.49 C223.1@3005.32,184.49 ; C247.1@2964.4,445.29 2964.4,450.25 2960.86,453.79 2960.3,453.79 2950.79,463.31 2950.79,481.18 2960.86,491.25 2960.86,496.03 2962.2,497.37 v1(2968.58,497.37) ; C242.1@2965.86,597.53 C250.1@2965.86,551.53 2965.86,551.27 v1(2968.58,548.55) ; C215.1@3003.86,90.03 3003.86,86.53 3027.36,63.03 C197.1@3027.36,30.03 ; v1(1535.86,589.31) v1(1551.61,589.31) v1(1551.61,605.06) ; v1(1535.86,589.31) v1(1535.86,605.06) ; v1(1535.86,605.06) v1(1551.61,605.06) ; v1(1535.86,605.06) v1(1535.86,620.81) v1(1551.61,620.81) v1(1551.61,605.06) ; 2278.07,-173.29 v1@2278.23,-165.13 ; 2278.07,-173.29 2282.12,-168.91 2285.61,-165.13 ; v1@2278.23,-165.13 2285.61,-165.13
  Bottom Layer w10: X5.2@1121.68,678.69 ccw(c1136.08,693.09) X5.2@1136.08,672.73 ; v2(1203.61,648.23) v2(1203.61,623.73) 1238.31,623.73 ccw(c1238.31,625.23) 1239.37,624.17 C78.1@1239.37,657.23 C4.1@1239.37,698.77 ; C40.2@1316.68,-142.47 C43.2@1316.68,-102.47 C32.1@1316.68,-62.77 C31.2@1316.68,-8.98 ; C34.1@1340.13,28.53 1320.92,9.31 1234.04,9.31 cw(c1234.04,27.67) 1215.68,27.67 1215.68,162.72 cw(c1235.89,162.72) 1235.89,182.92 1308.38,182.92 1338.78,152.53 C35.1@1345.18,148.53 ; C34.1@1340.18,32.38 v5(1344.04,28.53) ; 1356.18,487.9 1356.27,488 ; C3.1@1358.12,700.25 C3.1@1358.12,704.16 ; 1728.85,-345.69 1758.71,-345.69 U8.1@1760.25,-347.23 1760.25,-349.2 1797.65,-386.6 1802.48,-391.43 1886.33,-391.43 D6.2@1890.53,-395.63 D7.2@1933.15,-395.63 ; C165.2@1774.18,-264.92 1798.88,-264.92 ; R23.1@1802.89,-225.97 1802.89,-260.92 1798.88,-264.92 ; C166.1@1812.97,-266.56 1820.02,-266.56 1821.69,-268.23 1856.27,-268.23 1856.62,-268.58 1876.72,-268.58 v5(1877.07,-268.23) ; C166.1@1812.97,-264.92 1798.88,-264.92 ; R42.1@1908.63,746.73 1909.76,745.6 Q7.2@1909.76,705.5 v2(1909.76,673.4) ; R86.1@2025.16,746.73 2026.84,745.04 Q8.2@2026.84,705.5 ; Q8.2@2026,706.34 2026,699.01 2028.09,696.92 v2@2042.96,696.92 ; v1(2450.49,44.99) 2490.94,44.99 cw(c2490.94,37.87) 2492.9,44.71 2501.01,37.87 2501.44,37.87 C158.2@2502.35,37.87 C157.2@2530.35,37.87 ; C216.1@2635.75,741.72 2671.17,741.72 ccw(c2671.17,742.7) D11.1@2672.15,742.7 2671.96,742.7 2671.96,771.73 ; C243.1@2799.86,246.87 cw(c2799.86,232.78) 2806.82,245.03 C243.1@2811.1,245.03 ; v1(2811.1,241.46) C208.1@2831.71,241.46 ; C243.1@2811.1,242.3 2811.59,241.81 2811.93,241.81 2815.15,245.03 C208.1@2840.32,245.03 ; C228.1@2837.36,107.07 ccw(c2830.21,114.21) 2840.32,114.21 C209.1@2840.32,145.03 ; v2(2837.36,722.86) C199.1@2837.36,740.03 ; v1(2874.09,62.33) 2874.09,69.72 cw(c2877.36,69.72) C211.1@2877.36,72.99 ; C203.1@2942.59,-117.62 v2(2942.59,-105.12) ; C218.1@2965.86,142.17 2968.54,139.48 2968.89,139.82 2998.07,139.82 v1(2998.41,139.48) ; v1(3031.97,471.78) 3035.17,471.78 cw(c3035.17,465.8) C234.1@3039.4,470.03 ; C255.1@3193.66,123.3 3218.62,123.3 3229.67,134.34 D2.1@3229.67,170.79 3229.67,207.55 3218.93,218.28 3216.25,218.28 ; C230.1@3193.66,218.28 3216.25,218.28 ; v2(3227.13,309.53) 3227.13,307.97 3229.67,305.44 D1.1@3229.67,266.54 3229.67,231.7 3216.25,218.28
  Bottom Layer w12: D30.2@699.41,155.53 699.41,153.36 D30.2@704.24,148.53 ; D30.2@708.98,145.96 v5(718.09,145.96) ; D29.2@708.98,207.53 v1(718.09,207.53) ; R89.1@956.65,391.73 v1(973.65,391.73)
  Bottom Layer w15: R27.1@828.69,481.02 846.65,481.02 ; U4.2@846.65,539.35 846.65,481.02 ; C2.1@865.2,481.02 846.65,481.02 ; R113.2@1126.89,-390.29 1304.36,-390.29 C290.1@1306.36,-392.29 1367.42,-392.29 ccw(c1367.42,-368.52) 1391.2,-368.52 1391.2,-331.29 1399.73,-322.75 v2(1399.73,-322.55) ; v2(1178.44,209.74) 1178.6,209.9 C5.1@1221.72,209.9 ; C106.1@1568.22,512.39 v2(1568.26,534.93) ; C95.1@1629.13,743.53 C99.1@1687.36,743.53 1697.36,751.03 v2(1714.2,774.45) ; C70.1@1631.18,319.53 1631.18,317.03 1638.68,309.53 1643.41,309.53 1657.32,295.62 ; 1657.45,295.62 1674.89,279.33 1676.99,278.44 1678.42,277.83 C67.1@1678.42,246.03 ; C132.2@1702.36,613.53 C148.1@1745.86,613.53 C173.1@1787.36,613.53 ; C122.2@1916.93,103.24 1917.81,102.36 1917.81,80.39 v2(1917.95,80.25) ; C227.1@2842.36,633.53 2877.36,633.53 v1(2877.36,632.07) ; C238.1@3160.86,367.53 v2(3227.13,367.53) ; C214.1@3164.86,309.53 v2(3227.13,309.53) ; C201.1@3188.87,445.19 v2(3227.13,445.18)
  other v1: 661.39,-424.67 677.14,-424.67 692.89,-424.67 661.39,-408.93 677.14,-408.93 692.89,-408.93 2215.33,-302.93 1213.05,-281.24 1230.59,-281.24 1248.13,-281.24 1212.85,-266.59 1230.4,-266.59 1247.94,-266.59 2390.35,-164.47 2390.35,-122.47 3031.22,59.49 2196.33,144.87 2341.75,235.13 2178.23,343.92 2160.14,362.02 2196.33,362.02 556.02,376.86 585.07,376.86 609.09,376.86 2178.23,380.11 556.02,399.41 585.07,399.41 609.09,399.41 2069.66,416.3 556.02,436.35 585.07,436.35 609.09,436.35 2142.04,452.49 2322.99,452.49 609.09,458.53 609.09,480.1 609.09,501.25 556.02,521.65 585.07,521.65 609.09,521.65 556.02,543.64 585.07,543.64 609.09,543.64 2779.1,548.52 556.02,604.14 585.07,604.14 609.09,604.14 556.02,626.69 585.07,626.69 609.09,626.69 609.09,647.87 1118.68,659.33 609.09,682.45 609.09,702.59 2981.57,719.66 556.02,723 585.07,723 609.09,723 556.02,744.98 585.07,744.98 609.09,744.98
  other v2: 2982.7,-376.58 3126.19,-344.25 1615.63,-308.92 1820.88,-273.92 2888.17,-222.18 840.27,-214.27 873.81,-214.27 907.36,-214.27 1417.97,-199.01 2941.37,-196.73 2888.63,-195.81 840.27,-188.73 873.81,-188.73 907.36,-188.73 840.27,-163.18 873.81,-163.18 907.36,-163.18 457.47,-143.69 614.01,-141.38 457.47,-125.43 840.27,-119.64 873.81,-119.64 907.36,-119.64 457.47,-106.88 840.27,-94.1 873.81,-94.1 907.36,-94.1 3140.46,-90.18 840.27,-68.55 873.81,-68.55 907.36,-68.55 1502.09,-18.16 1526.09,-18.16 1478.09,1.84 1502.09,1.84 1526.09,1.84 1478.09,21.84 1502.09,21.84 1526.09,21.84 1478.09,41.84 1502.09,41.84 1526.09,41.84 1478.09,61.84 1502.09,61.84 1526.09,61.84 1502.09,81.84 1526.09,81.84 1086.1,228.47 1111.42,228.47 1616.45,326.62 480.54,365.38 505.04,365.38 480.54,387.53 505.04,387.53 480.54,465.59 505.04,465.59 480.54,487.74 505.04,487.74 737.72,488 1420.76,502.86 1420.76,521.36 737.72,523.43 737.72,558.86 480.54,563.73 505.04,563.73 480.54,585.87 505.04,585.87 737.72,594.29 1692.4,603.94 968.02,648.02 480.54,663.94 505.04,663.94 480.54,686.08 505.04,686.08 2044.96,696.92 742.72,723 767.22,723 742.72,747.13 767.22,747.13 1204.36,753.43 480.54,763.82 505.04,763.82 1734.2,774.45 1754.2,774.45 1774.2,774.45 2459.36,779.73 2671.96,779.73
  other v3: 2326.76,-286.15 1091.92,-270.15 1091.92,-222.91 1091.92,-175.66 2459.27,-160.21 1091.92,-128.12 2459.27,-126.95 1091.92,-81.26 1775.99,-34.93 1796.68,-34.93 1817.36,-34.93 1579.25,-18.06 1599.94,-18.06 1620.63,-18.06 1775.99,-14.24 1796.68,-14.24 1817.36,-14.24 1579.25,2.62 1599.94,2.62 1620.63,2.62 1579.25,23.31 1599.94,23.31 1620.63,23.31 1579.25,44 1599.94,44 1581.32,134.78 1023.11,167.25 1648.25,183.28 654.01,378.66 687.94,378.66 724.55,378.66 654.01,455.6 687.94,455.6 724.55,455.6 654.01,626.69 687.94,626.69 724.55,626.69 654.01,703.63 687.94,703.63 724.55,703.63
  other v4: 737.03,-420.79 1023.83,-420.79 857.75,-391.04 888.3,-391.04 668.68,-241.24 952.21,54.6 841.99,124.34 784.37,346.26
  other v5: 1649.71,-409.91 1549.41,-409.3 1599.41,-409.3 1672.72,-277.02 1713.13,-277.02 1070.21,-79.08 1316.78,-41.28 1317.26,-10.64 643.46,-3.88 643.46,16.97 1031.94,60.7 1345.18,139.53 1453.36,244.62 1471.36,244.62 1489.36,244.62 1421.18,331.57 1421.18,350.58 1421.18,440.96 1421.18,468.11
  other v6: 1052.22,-335.87 1362.45,15.85 1376.83,15.85
HDMI_5V_DET: R152.2 R153.1 U18.53 | length 218.2
  Top Layer w4: R153.1@683.11,-353.42 R153.1@686.79,-349.74
  Top Layer w6: R153.1@686.79,-349.74 817.64,-349.74 826.31,-341.07 U18.53@826.31,-311.78
  Top Layer w10: R153.1@683.11,-353.42 R152.2@683.11,-312.85
HDMI_TX0_N: R49.1 R67.2 R133.1 | length 1998.6
  Top Layer w3.5: R133.1@1134.71,-211.08 1134.71,-205.22 1147.54,-205.14 v3(1147.55,-207.29) ; v3@1147.57,-205.14 1160.21,-205.22 R49.1@1160.25,-211.08 ; v6(1745.48,504.86) 1746.22,504.86 1767.58,483.5 1770.48,483.5 1772.16,485.18 R67.2@1777.2,485.18
  Signal L1 w3.5: v3(1147.55,-207.29) ccw(c1145.4,-207.29) 1146.85,-205.7 ccw(c1145.4,-207.29) 1145.4,-205.14 1023.55,-205.14 996.44,-178.03 996.44,64.77 895.41,165.8 895.41,468.35 948.41,521.35 1171.58,521.35 1252.52,440.41 1359.02,440.41 cw(c1359.05,422.16) 1377.3,422.16 1377.3,414.45 ccw(c1384.05,414.45) 1390.8,414.45 1390.8,424.06 cw(c1409.05,424.06) 1427.3,424.06 1427.3,414.45 ccw(c1434.05,414.45) 1440.8,414.45 1440.8,424.06 cw(c1459.05,424.06) 1477.3,424.06 1477.3,415.9 ccw(c1484.05,415.9) 1484.05,409.15 1575.47,409.15 1669.03,502.71 1745.48,502.71 v6(1745.48,504.86) ; v3@1147.55,-205.7 1148.96,-205.7 v3@1150.55,-207.29
HDMI_TX0_P: R48.1 R66.2 R134.1 | length 1998.6
  Top Layer w3.5: R134.1@1134.71,-187.86 1134.71,-193.72 1147.52,-193.64 v3(1147.55,-191.48) ; v3@1147.59,-193.64 1160.21,-193.72 R48.1@1160.25,-187.86 ; v6(1745.18,489.05) 1745.77,489.05 1756.22,478.6 1756.22,469.25 1754.7,467.72 R66.2@1754.7,462.68
  Signal L1 w3.5: v3@1147.55,-193.07 1148.96,-193.07 v3@1150.55,-191.48 ; v3(1147.55,-191.48) cw(c1145.4,-191.48) 1146.85,-193.07 cw(c1145.4,-191.48) 1145.4,-193.64 1028.31,-193.64 1007.94,-173.26 1007.94,69.53 906.91,170.56 906.91,463.59 953.17,509.85 1166.81,509.85 1247.76,428.91 1297.9,428.91 cw(c1297.9,423.08) 1303.72,423.08 1303.72,415.45 ccw(c1309.47,415.45) 1315.22,415.45 1315.22,423.16 cw(c1320.97,423.16) 1326.72,423.16 1326.72,420.1 ccw(c1332.47,420.1) 1338.22,420.1 1338.22,423.16 cw(c1343.97,423.16) 1343.97,428.91 1359.13,428.91 cw(c1359.05,422.16) 1365.8,422.16 1365.8,414.45 ccw(c1384.05,414.45) 1402.3,414.45 1402.3,424.06 cw(c1409.05,424.06) 1415.8,424.06 1415.8,414.45 ccw(c1434.05,414.45) 1452.3,414.45 1452.3,424.06 cw(c1459.05,424.06) 1465.8,424.06 1465.8,415.9 ccw(c1484.05,415.9) 1484.05,397.65 1580.24,397.65 1673.8,491.21 1745.18,491.21 v6(1745.18,489.05)
HDMI_TX1_N: R55.1 R65.2 R141.1 | length 1998.6
  Top Layer w3.5: R141.1@1134.71,-163.84 1134.71,-157.98 1147.54,-157.9 v3(1147.55,-160.05) ; v3@1147.57,-157.9 1160.21,-157.98 R55.1@1160.25,-163.84 ; v6(1700.48,459.86) 1701.22,459.86 1722.58,438.5 1725.48,438.5 1727.16,440.18 R65.2@1732.2,440.18
  Signal L1 w3.5: v3(1147.55,-160.05) ccw(c1145.4,-160.05) 1146.85,-158.46 ccw(c1145.4,-160.05) 1145.4,-157.9 1035.94,-157.9 1020.2,-142.16 1020.2,76.03 920.46,175.77 920.46,458.03 959.37,496.94 1160.59,496.94 1292.38,365.15 1297.8,359.74 1322.88,359.74 cw(c1322.88,342.49) 1340.13,342.49 1340.13,340.25 ccw(c1345.88,340.25) 1345.88,334.5 ccw(c1345.88,340.25) 1351.63,340.25 1351.63,354.53 cw(c1368.88,354.53) 1368.88,371.78 cw(c1368.88,354.53) 1386.13,354.53 1386.13,340.25 ccw(c1391.88,340.25) 1391.88,334.5 ccw(c1391.88,340.25) 1397.63,340.25 1397.63,354.53 cw(c1414.88,354.53) 1414.88,371.78 cw(c1414.88,354.53) 1432.13,354.53 1432.13,340.25 ccw(c1437.88,340.25) 1437.88,334.5 ccw(c1437.88,340.25) 1443.63,340.25 1443.63,354.53 cw(c1460.88,354.53) 1460.88,371.78 cw(c1460.88,354.53) 1478.13,354.53 1478.13,341.46 ccw(c1483.88,341.46) 1483.88,335.71 ccw(c1483.88,341.46) 1489.63,341.46 1489.63,353.99 cw(c1506.88,353.99) 1506.88,371.24 cw(c1506.88,353.99) 1524.13,353.99 1524.13,342.49 ccw(c1529.88,342.49) 1529.88,336.74 ccw(c1529.88,342.49) 1535.63,342.49 cw(c1552.88,342.49) 1552.88,359.74 1566.17,359.74 1574.14,367.71 1664.14,457.71 1700.48,457.71 v6(1700.48,459.86) ; v3@1147.55,-158.46 1148.96,-158.46 v3@1150.55,-160.05
HDMI_TX1_P: R64.2 R74.1 R142.1 | length 1998.7
  Top Layer w3.5: R142.1@1134.71,-140.62 1134.71,-146.48 1147.51,-146.4 v3(1147.55,-144.24) ; v3@1147.59,-146.4 1160.21,-146.48 R74.1@1160.25,-140.62 ; v6(1700.18,444.05) 1700.77,444.05 1711.22,433.6 1711.22,424.25 1709.7,422.72 R64.2@1709.7,417.68
  Signal L1 w3.5: v3@1147.55,-145.83 1148.96,-145.83 v3@1150.55,-144.24 ; v3(1147.55,-144.24) cw(c1145.4,-144.24) 1146.85,-145.83 cw(c1145.4,-144.24) 1145.4,-146.4 1040.71,-146.4 1031.7,-137.39 1031.7,-37.49 1031.7,-1.24 cw(c1037.45,-1.24) 1037.45,4.51 1043.01,4.51 ccw(c1043.01,10.26) 1043.01,16.01 1037.45,16.01 cw(c1037.45,21.76) 1037.45,27.51 1042.65,27.51 ccw(c1042.65,33.26) 1042.65,39.01 1037.45,39.01 cw(c1037.45,44.76) 1031.7,44.76 1031.7,80.79 1030.78,81.72 931.96,180.54 931.96,453.27 964.14,485.44 1155.83,485.44 1293.03,348.24 1322.88,348.24 cw(c1322.88,342.49) 1328.63,342.49 1328.63,340.25 ccw(c1345.88,340.25) 1345.88,323 ccw(c1345.88,340.25) 1363.13,340.25 1363.13,354.53 cw(c1368.88,354.53) 1368.88,360.28 cw(c1368.88,354.53) 1374.63,354.53 1374.63,340.25 ccw(c1391.88,340.25) 1391.88,323 ccw(c1391.88,340.25) 1409.13,340.25 1409.13,354.53 cw(c1414.88,354.53) 1414.88,360.28 cw(c1414.88,354.53) 1420.63,354.53 1420.63,340.25 ccw(c1437.88,340.25) 1437.88,323 ccw(c1437.88,340.25) 1455.13,340.25 1455.13,354.53 cw(c1460.88,354.53) 1460.88,360.28 cw(c1460.88,354.53) 1466.63,354.53 1466.63,341.46 ccw(c1483.88,341.46) 1483.88,324.21 ccw(c1483.88,341.46) 1501.13,341.46 1501.13,353.99 cw(c1506.88,353.99) 1506.88,359.74 cw(c1506.88,353.99) 1512.63,353.99 1512.63,342.49 ccw(c1529.88,342.49) 1529.88,325.24 ccw(c1529.88,342.49) 1547.13,342.49 cw(c1552.88,342.49) 1552.88,348.24 1570.93,348.24 1668.9,446.21 1700.18,446.21 v6(1700.18,444.05)